# Altium PCB gordak_analog_V1.PcbDoc
Units mm, origin at the board's own origin, x right, y up, seen from the top; angles counter-clockwise.
Board outline 120.25 x 70.25 mm, 2 copper layers (Top Layer, Bottom Layer), stack 1.569 mm thick; 96 components, 52 nets, 228 pads, 8 vias.
Unrouted connection lines stored in the file: 1.
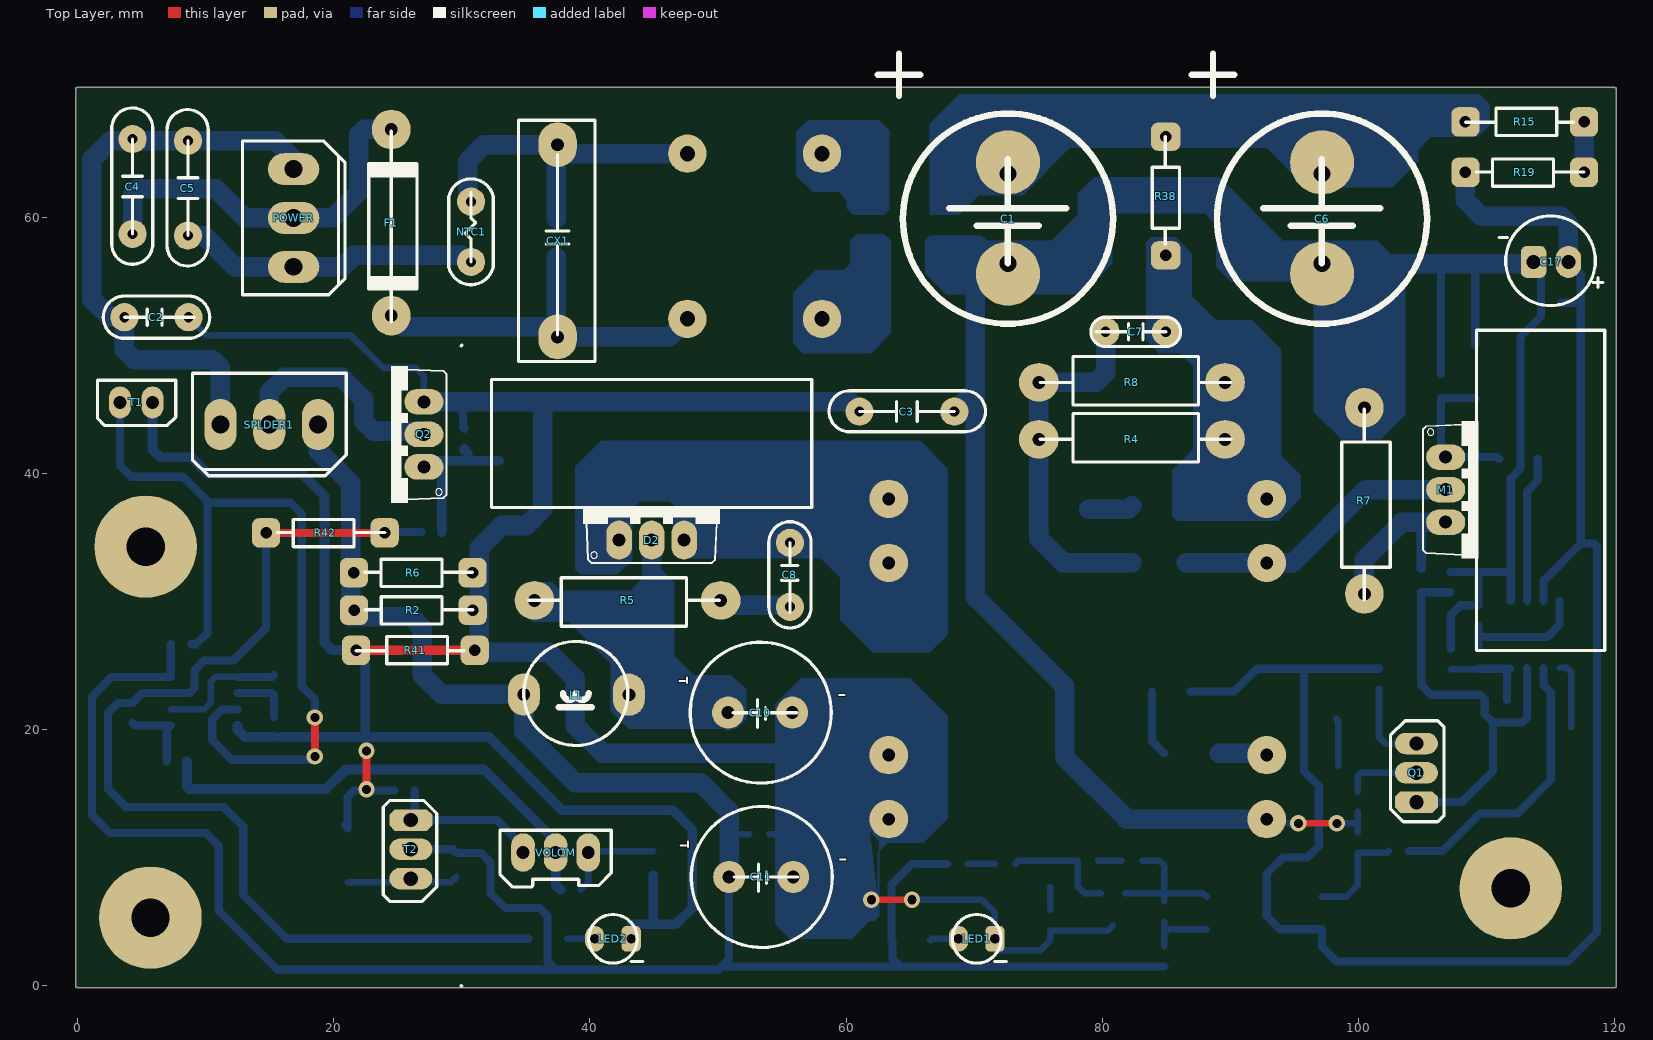
[diagram p0: Top Layer view]
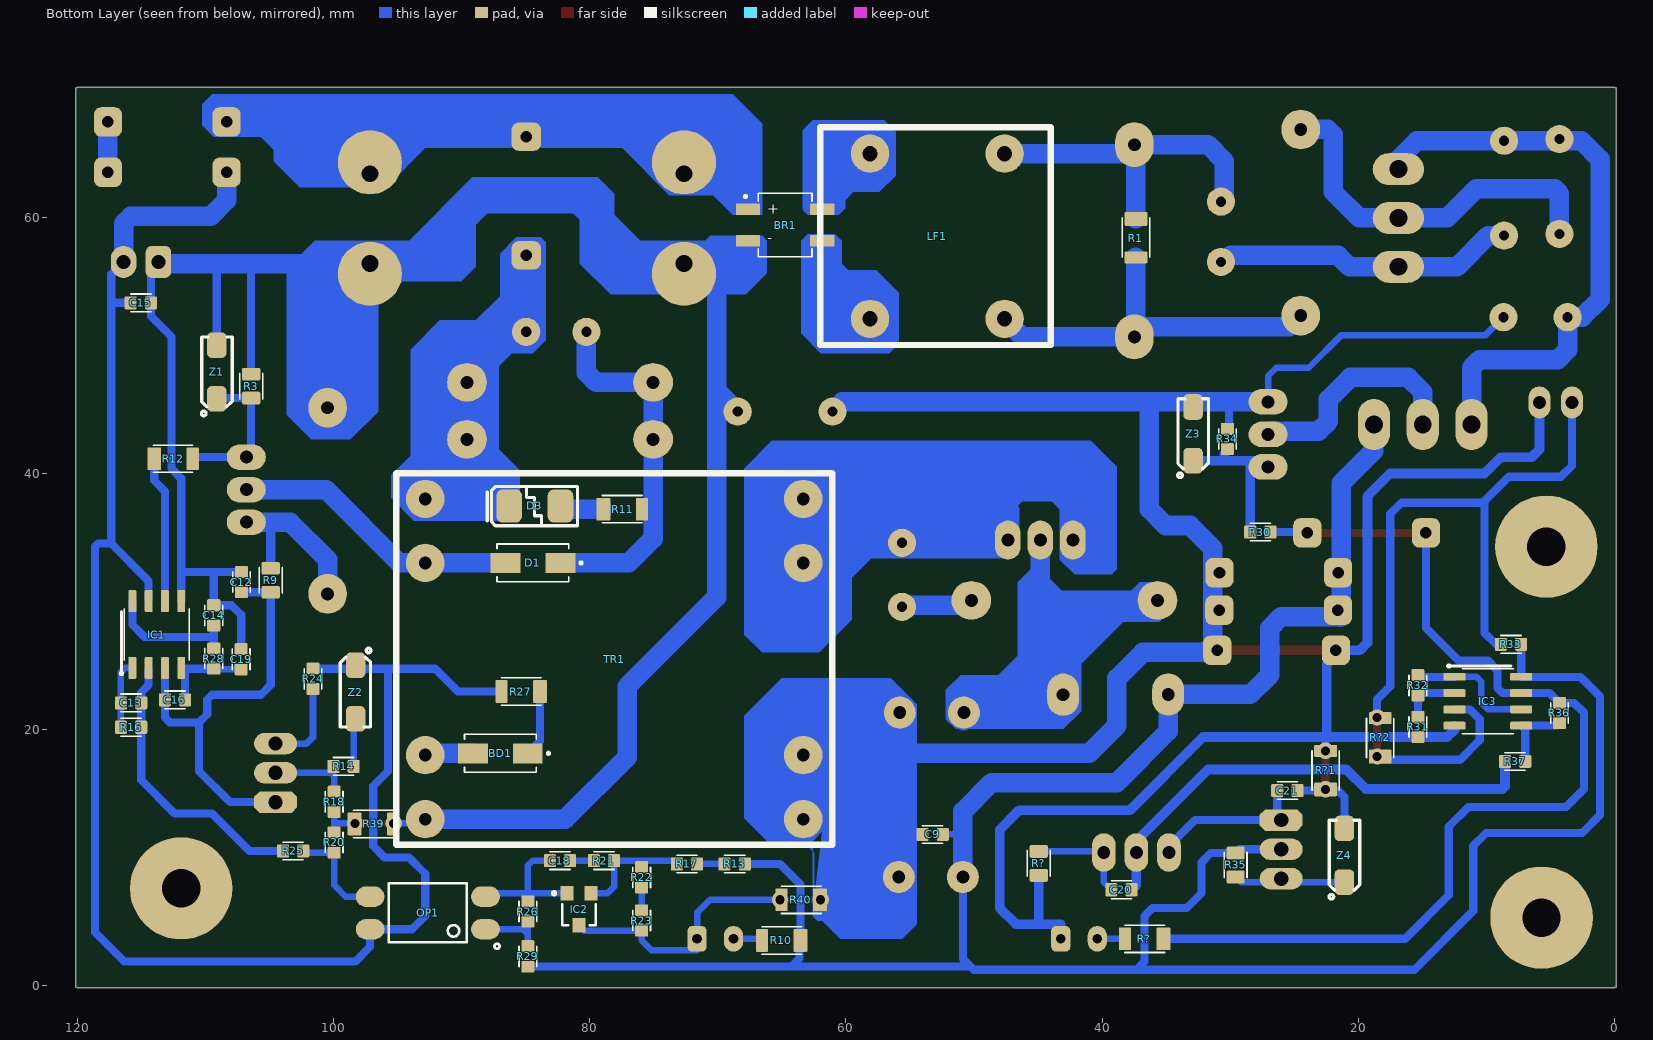
[diagram p1: Bottom Layer view, seen from below]
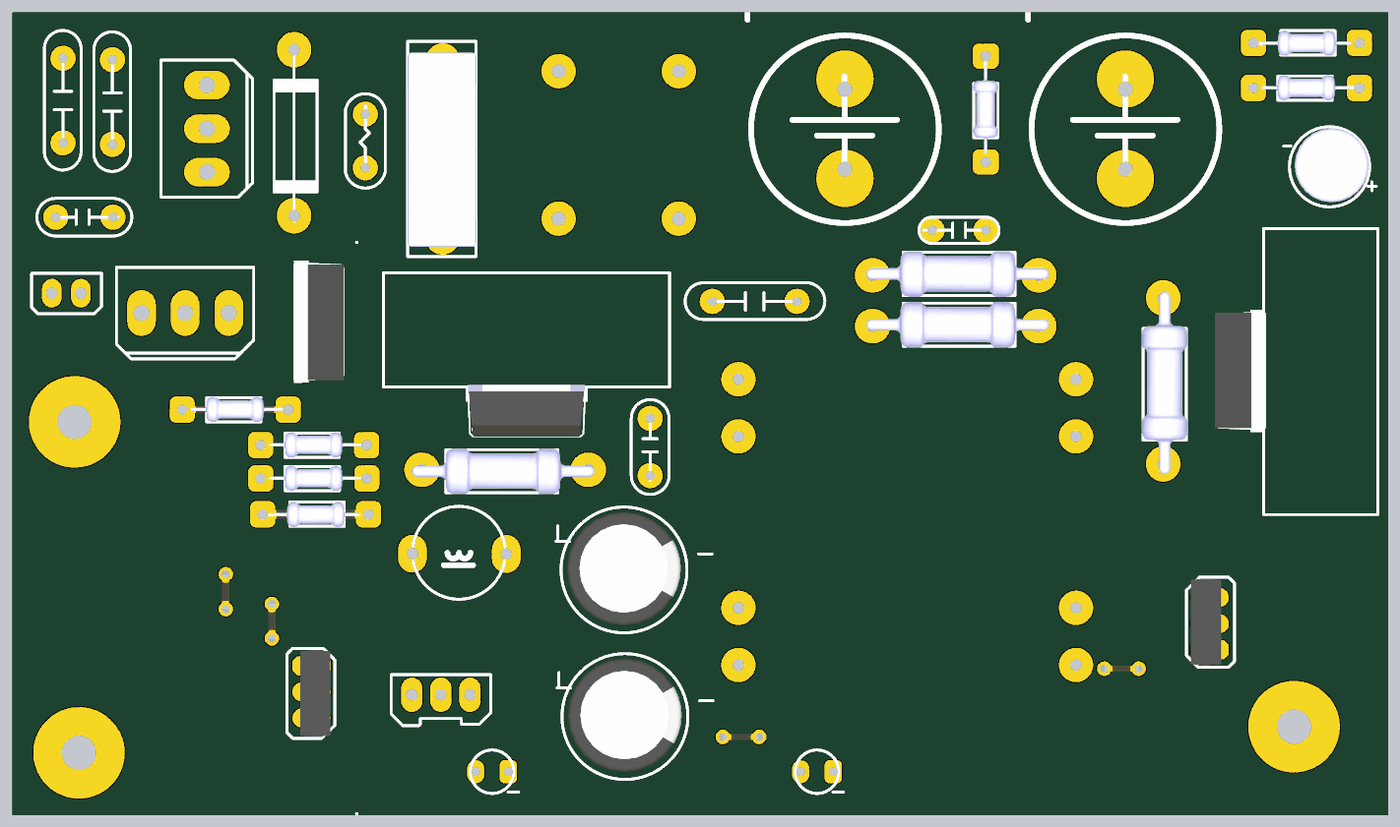
[diagram p2: 3D render of the assembled board from above, using the file's embedded part models]
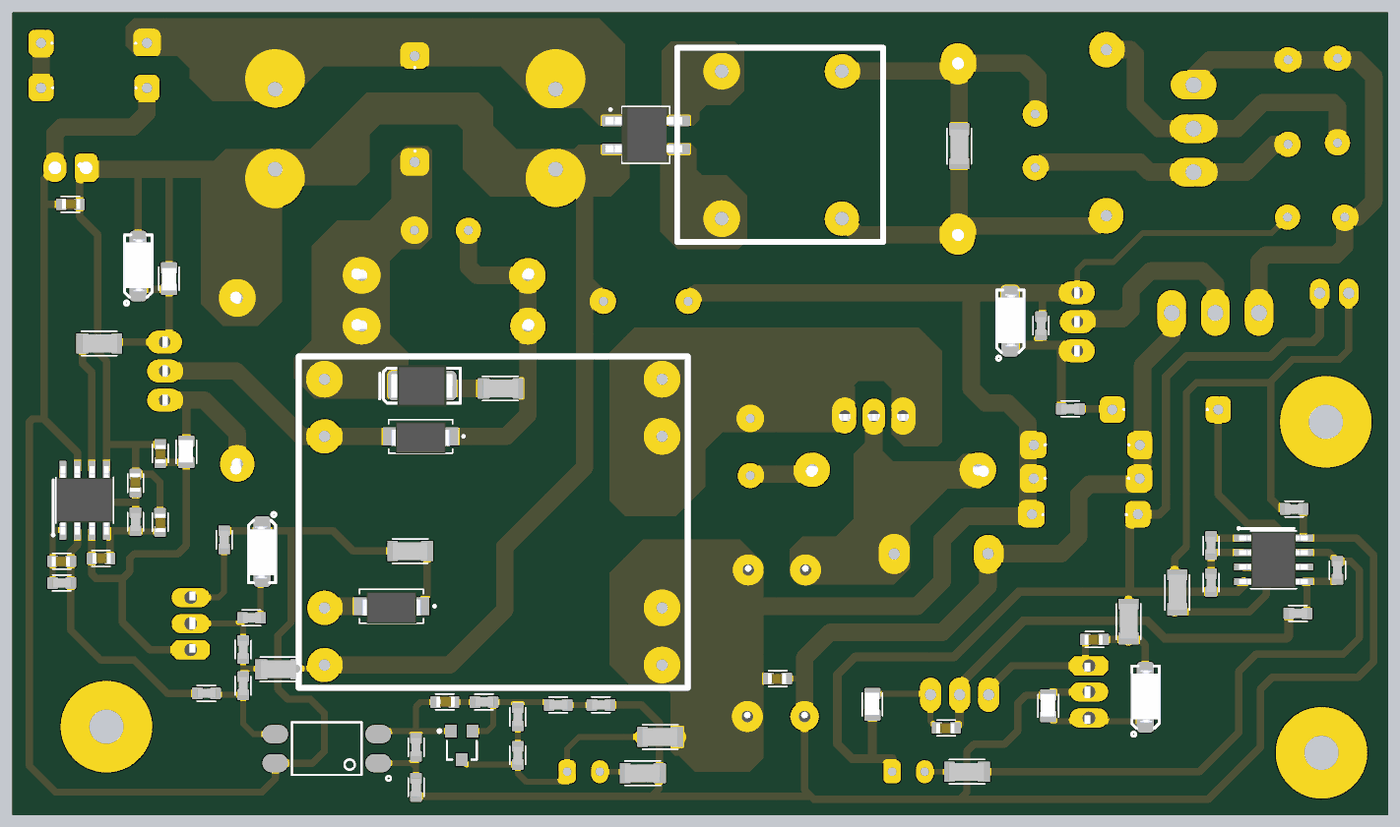
[diagram p3: 3D render of the assembled board from below, using the file's embedded part models]

## Layer stack, top to bottom
Top Solder: solder mask 0.0254, SM-001, Dk 4
Top Layer: signal copper 0.035
Dielectric 1: core 1.4986, Core-043, Dk 4.3
Bottom Layer: signal copper 0.035
Bottom Solder: solder mask 0.0254, SM-001, Dk 4

## Board outline
-0.127,0 -0.127,70 cw(c0,70) 0,70.127 120,70.127 cw(c120,70) 120.127,70 120.127,0 cw(c120,0) 120,-0.127 0.127,-0.127 cw(c0.127,0) 0.064,-0.11 cw(c0,0)

## Design rules (kind name [scope] priority, off if disabled: settings)
Clearance [All] p1: gap=0.254 ignorepadtopadclearanceinfootprint=FALSE except(0: Arc-Hole Track-Hole SMDPad-Hole THPad-Hole Via-Hole Fill-Hole Poly-Hole Region-Hole Text-Hole)
ComponentClearance [All] p1: gap=0 collisioncheckmode=3 verticalgap=0 showdistances=FALSE
PolygonConnect [All] p1: connectstyle=Relief reliefconductorwidth=0.254 reliefentries=4 polygonreliefangle="90 Angle" airgapwidth=0.254
RoutingVias [All] p1: holewidth=0.711 width=1.27 viastyle="Through Hole" minholewidth=0.711 minwidth=1.27 maxholewidth=0.711 maxwidth=1.27
SolderMaskExpansion [All] p1: expansion=0.102 istentingtop=FALSE
Width [All] p1: maxlimit=5 minlimit=0.254 preferedwidth=0.254 minimp=50.000000 maximp=50.000000 favimp=50.000000
29 further rules are at their usual default settings.

## Classes and differential pairs
component class power: BD1 BR1 C1 C2 C3 C4 C5 C6 C7 C8 C9 C10 C11 C12 C13 C14 C15 C16 C17 C18 C19 C20 C21 CX1 D1 D2 D3 F1 IC1 IC2 IC3 L1 LED1 LED2 LF1 M1 NTC1 OP1 POWER Q1 Q2 R1 R2 R3 R4 R5 R6 R7 R8 R9 R10 R11 R12 R13 R14 R15 R16 R17 R18 R19 R20 R21 R22 R23 R24 R25 R26 R27 R28 R29 R30 R31 R32 R33 R34 R35 R36 R37 R? SPLDER1 T1 T2 TR1 VOLOM Z1 Z2 Z3 Z4

## Components (designator, comment, footprint, x,y, rotation, side; value= is the part's Value field where it differs from the comment)
BD1 "US1M" DIOD/1N4007/SMD 84.817,18.161 r0 bottom
BR1 "MB6S" MB6S/SMD 64.749,58.756 r0 bottom
C1 "33uF/400V" CAP-EL-P7MM 72.644,56.388 r90 top
C2 "10nF/2KV" CAP_Y_2KV 3.683,52.197 r0 top
C3 "JY222M" CAP_Y_4KV 61.053,44.831 r0 top
C4 "JY222M" CAP_Y_4KV 4.318,58.699 r90 top
C5 "JY222M" CAP_Y_4KV 8.636,58.572 r90 top
C6 "33uF/400V" CAP-EL-P7MM 97.155,56.388 r90 top
C7 "103,2KV" CAP_Y_1KV 84.963,51.054 r180 top
C8 "10nF/1KV" CAP_Y_2KV 55.626,34.591 r270 top
C9 "100nF" CAP-0603 53.34,11.811 r0 bottom
C10 "1000uF/35V" CAP-EL_P5MM 50.79,21.326 r0 top
C11 "1000uF/35V" CAP-EL_P5MM 50.87,8.499 r0 top
C12 "100pF" CAP-0603 107.171,31.421 r270 bottom
C13 "10nF" CAP-0603 115.899,22.081 r0 bottom
C14 "10nF" CAP-0603 109.364,29.031 r90 bottom
C15 "10nF" CAP-0603 114.935,53.34 r180 bottom
C16 "100pF" CAP-0603 112.268,22.352 r180 bottom
C17 "47uF/50V" cap/330u/16v 113.665,56.515 r0 top
C18 "100nF" CAP-0603 82.221,9.796 r180 bottom
C19 "10nF" CAP-0603 107.188,25.4 r270 bottom
C20 "100nF" CAP-0603 38.608,7.493 r0 bottom
C21 "100nF" CAP-0603 25.654,15.24 r0 bottom
CX1 "0.1uF/275V" CAP/0.22uF/275v/mkt 37.49,65.665 r270 top
D1 "HER208" DIOD/1N4007/SMD 82.277,33.02 r0 bottom
D2 "MBR10100SCT" TO220AB 44.831,34.798 r0 top
D3 "220V" TVS-5V-SMD 82.286,37.465 r0 bottom
F1 "3A" fuze_glass 24.511,66.851 r270 top
IC1 "uc3845" SOP-8 113.665,27.813 r90 bottom
IC2 "TL431" TL431 79.936,7.26 r0 bottom
IC3 "LM358" SOP-8 9.525,22.098 r180 bottom
L1 "10uH" INDUCTOR-10*16 43.053,22.733 r180 top
LED1 "LED-1COLER" led/3MM/DIP 71.628,3.683 r180 top
LED2 "LED-1COLER" led/3MM/DIP 43.236,3.683 r180 top
LF1 "" EMI_MID 47.625,52.07 r0 bottom
M1 "5N60C" TO-220 106.807,38.735 r270 top
NTC1 "5D-9" NTC_XD_7 30.734,56.515 r90 top
OP1 "pc817" pc817 92.837,5.842 r0 bottom
POWER "KF35-3PIN" XH3_BIG 16.891,56.134 r90 top
Q1 "MCR100" TO-225 104.521,16.637 r270 top
Q2 "IRF540" TO-220 27.051,43.053 r90 top
R1 "1M" RES/1206 37.498,58.412 r270 bottom
R2 "2K" RES/0.25W 21.603,29.337 r0 top
R3 "5.6K" RES/0805 105.493,45.769 r90 bottom
R4 "100K" RES/1W 75.057,42.665 r0 top
R5 "100K" RES/1W 50.214,30.099 r180 top
R6 "2K" RES/0.25W 21.59,32.258 r0 top
R7 "0.47R" RES/1W 100.457,45.134 r270 top
R8 "100K" RES/1W 75.057,47.11 r0 top
R9 "820R" RES/0805 105.835,32.717 r270 bottom
R10 "10K" RES/1206 65.024,3.683 r0 bottom
R11 "10R" RES/1206 77.47,37.084 r180 bottom
R12 "15R" RES/1206 112.522,41.021 r180 bottom
R13 "10K" RES/0603 68.778,9.525 r0 bottom
R14 "10R" RES/0603 99.314,17.145 r0 bottom
R15 "100K" RES/0.25W 117.602,67.437 r180 top
R16 "10K" RES/0603 115.895,20.193 r0 bottom
R17 "10K" RES/0603 72.517,9.525 r0 bottom
R18 "1K" RES/0603 99.949,14.478 r90 bottom
R19 "100K" RES/0.25W 108.344,63.5 r0 top
R20 "1K" RES/0603 99.949,11.303 r90 bottom
R21 "1K" RES/0603 78.994,9.779 r0 bottom
R22 "2K" RES/0603 75.946,8.58 r90 bottom
R23 "2K" RES/0603 75.946,5.207 r90 bottom
R24 "5.6K" RES/0603 101.6,23.876 r270 bottom
R25 "5.6K" RES/0603 103.251,10.541 r0 bottom
R26 "10K" RES/0603 84.836,5.715 r270 bottom
R27 "10R" RES/1206 85.344,23.114 r0 bottom
R28 "2K" RES/0603 109.347,25.654 r90 bottom
R29 "1K" RES/0603 84.836,2.413 r90 bottom
R30 "1K" RES/0603 27.559,35.433 r180 bottom
R31 "10K" RES/0603 15.367,20.32 r90 bottom
R32 "10K" RES/0603 15.367,23.368 r270 bottom
R33 "100K" RES/0603 8.001,26.67 r180 bottom
R34 "100K" RES/0603 30.226,42.799 r90 bottom
R35 "10K" RES/0805 30.524,10.492 r270 bottom
R36 "100K" RES/0603 4.318,21.209 r270 bottom
R37 "1K" RES/0603 7.874,17.526 r0 bottom
R38 "2K" RES/0.25W 84.95,57.028 r90 top (schematic designator R6)
R39 "0" RES/1206 96.889,12.516 r180 bottom (schematic designator R12)
R40 "10R" RES/1206 63.5,6.858 r0 bottom (schematic designator R27)
R41 "2K" RES/0.25W 31.018,26.204 r180 top (schematic designator R2)
R42 "2K" RES/0.25W 14.736,35.361 r0 top (schematic designator R6)
R? "10K" RES/1206 36.691,3.814 r0 bottom
R? "10K" RES/0805 45.891,10.619 r270 bottom
R?1 "10K" RES/1206 22.438,16.819 r90 bottom (schematic designator R?)
R?2 "10K" RES/1206 18.183,19.364 r90 bottom (schematic designator R?)
SPLDER1 "KF35-3PIN" XH3_BIG 11.176,43.815 r0 top
T1 "" CONECTOR/XH/2PIN 5.842,45.593 r180 top
T2 "MJE13003" TO-225 26.035,10.668 r90 top
TR1 "TRANSE_50W" TRANSE_50W 92.837,13.02 r180 bottom locked
VOLOM "XH3" XH3 39.854,10.39 r180 top
Z1 "18V" DIOD/RS1J 109.22,48.006 r90 bottom
Z2 "24V" DIOD/RS1J 98.171,22.86 r270 bottom
Z3 "18V" DIOD/RS1J 33.02,43.18 r90 bottom
Z4 "3.3V" DIOD/RS1J 21.209,10.287 r90 bottom

## Footprints (in the part's own frame and the unit in brackets; to place one, negate y for a bottom-side part, rotate by r counter-clockwise, add the part's x,y. Pads: shape width x height; smd on the part's side, far side on the other; paste and mask are expansions set on the pad)
CAP-0603 [mm]
  rrect20% 0.94x1.02 smd: 1(-0.893,-0.017) 2(0.687,-0.017)
  silkscreen extent -0.9,-0.71 0.7,0.67, body extent -0.84,-0.44 0.76,0.46, height 0.77
CAP-EL-P7MM [mm]
  round 5 hole 1.3 copper offset 0.9,0: +(7,0)
  round 5 hole 1.3 copper offset -0.8,0: -(0,0)
  silkscreen extent -4.7,-8.2 16.38,10.16
CAP-EL_P5MM [mm]
  round 2.5 hole 1: +(0.01,0.01) -(5.01,0.01)
  silkscreen extent -2.95,-5.49 8.05,5.51, body extent -2.48,-4.86 7.52,5.14, height 16
CAP/0.22uF/275v/mkt [mm]
  oval 3.5x3 hole 1: 1(0,0) 2(15,0)
  silkscreen extent -1.91,-3.05 16.91,2.92, body extent -0.94,-3.05 16.06,2.95, height 11.5
cap/330u/16v [mm]
  oval 2x2.5 hole 1.1: +(2.72,0)
  rrect50% 2x2.5 hole 1.1: -(0,0)
  silkscreen extent -2.7,-3.41 5.4,3.59, body extent -1.74,-3.02 4.76,3.48, height 11
CAP_Y_1KV [mm]
  round 2.2 hole 0.8: 1(0,0) 2(4.7,0)
  silkscreen extent -1.15,-1.15 5.85,1.15
CAP_Y_2KV [mm]
  round 2.2 hole 0.8: 1(0,0) 2(5,0)
  silkscreen extent -1.65,-1.65 6.65,1.65
CAP_Y_4KV [mm]
  round 2.2 hole 0.8: 1(0,0) 2(7.4,0)
  silkscreen extent -2.37,-1.58 9.83,1.63
CONECTOR/XH/2PIN [mm]
  oval 1.7x2.5 hole 1: 1(-0.033,0.044) 2(2.507,0.044)
  silkscreen extent -1.84,-1.69 4.26,1.84
DIOD/1N4007/SMD [mm]
  rect 2.33x1.56 smd: A(4.299,0) K(0.019,0)
  silkscreen extent -1.7,-1.48 4.96,1.48, body extent -0.44,-1.24 4.76,1.49, height 2.6
DIOD/RS1J [mm]
  rrect50% 2x1.524 smd: A(2.013,-0.106) K(-2.178,-0.106)
  silkscreen extent -3.5,-1.31 2.65,1.09, body extent -2.32,-1.44 2.28,1.16, height 2.1
EMI_MID [mm]
  round 3 hole 1.2: 1(0,0) 2(10.5,0) 3(0,-12.9) 4(10.5,-12.9)
  silkscreen extent -3.61,-14.96 14.39,2.04
fuze_glass [mm]
  oval 3.1x3 hole 1: 1(0,0) 2(14.527,0)
  silkscreen extent 0.11,-1.89 15,2.02
INDUCTOR-10*16 [mm]
  oval 2.5x3.3 hole 1: 1(0,0) 2(8.2,-0.025)
  silkscreen extent 0.08,-4.16 8.2,3.96
led/3MM/DIP [mm]
  oval 1.5x2 hole 0.762: A(2.85,0)
  rrect50% 1.5x2 hole 0.762: K(0,0)
  silkscreen extent -0.89,-1.9 3.32,1.9
MB6S/SMD [mm]
  rrect23% 1.91x0.91 smd: +(2.9,-1.86) -(2.9,0.59) F(-2.9,0.59) N(-2.9,-1.86)
  silkscreen extent -2.1,-3.12 3.2,1.85, body extent -3.19,-3 3.51,1.72, height 2.9
NTC_XD_7 [mm]
  round 2.2 hole 0.8: 1(0,0) 2(4.7,0)
  silkscreen extent -1.78,-1.74 6.48,1.74
pc817 [mm]
  oval 2.25x1.6 smd: 1(-4.699,1.409) 2(-4.699,-1.131) 3(4.301,-1.131) 4(4.301,1.409)
  silkscreen extent -5.8,-2.16 2.85,2.94
RES/0.25W [mm]
  rrect50% 2.2x2.3 hole 0.9: 1(0,0) 2(9.258,0)
  silkscreen extent 0.85,-1.07 9.26,1.05, body extent 0.81,-1.08 8.41,1.12, height 2.1
RES/1W [mm]
  oval 3.1x3 hole 1: 1(0,0) 2(14.527,0)
  silkscreen extent 0.11,-1.76 15,2.02, body extent -0.56,-1.87 15.44,2.13, height 5
RES/0603 [mm]
  rrect20% 0.94x1.02 smd: 1(-0.889,0) 2(0.691,0)
  silkscreen extent -0.9,-0.69 0.7,0.69, body extent -0.93,-0.41 0.67,0.39, height 0.43
RES/0805 [mm]
  rrect25% 1x1.42 smd: 1(0.113,0.933) 2(1.983,0.933)
  silkscreen extent 0.05,0.04 2.05,1.82, body extent 0,0.28 2,1.53, height 0.6
RES/1206 [mm]
  rrect14% 1.09x1.77 smd: 1(-1.469,0.131)
  rrect14% 0.94x1.77 smd: 2(1.536,0.131)
  silkscreen extent -1.55,-0.93 1.55,1.2, body extent -1.51,-0.65 1.59,0.9, height 0.55
SOP-8 [mm]
  rrect25% 1.71x0.61 smd: 1(-2.986,2.032) 2(-2.986,0.762) 3(-2.986,-0.508) 4(-2.986,-1.778) 5(2.224,-1.778) 6(2.224,-0.508) 7(2.224,0.762) 8(2.224,2.032)
  silkscreen extent -3.53,-2.4 1.62,2.98, body extent -3.38,-2.32 2.62,2.58, height 1.75
TL431 [mil]
  rect 40x45 smd: A(35.5,99.24) C(72.91,0.81) REF(-1.9,0.81)
  silkscreen extent -16,-4 117,99
TO220AB [mil]
  oval 78.74x120 hole 40: 1(-100,0) 2(0,0) 3(100,0)
  silkscreen extent -210,-70 210,100, body extent -202,-70 200,107, height 810
TO-220 [mil]
  oval 78.74x120 hole 40: 1(-100.04,-0.04) 2(-0.04,-0.04) 3(99.96,-0.04)
  silkscreen extent -210,-70 210,100, body extent -201,-72 196,103, height 781
TO-225 [mil]
  oval 66x132 hole 44: 1(-90,0) 2(0,0)
  oct 66x132 hole 44: 3(90,0)
  silkscreen extent -160,-80 150,85, body extent -155,-65 144,39, height 520
TRANSE_50W [mm]
  round 3 hole 1: 1(0,25) 2(0,20) 5(0,5) 6(0,0) 7(29.5,0) 8(29.5,5) 11(29.5,20) 12(29.5,25)
  silkscreen extent -2.25,-2.01 31.75,27
TVS-5V-SMD [mm]
  rrect50% 2x2.6 smd: 1(4,0) 2(0,0)
  silkscreen extent -1.33,-1.53 5.72,1.54, body extent -0.66,-1.79 4.74,1.83, height 2.43
XH3 [mm]
  oval 1.85x3 hole 1: 1(-0.024,-0.024) 2(2.516,-0.024) 3(5.056,-0.024)
  silkscreen extent -1.83,-1.78 6.87,2.67
XH3_BIG [mm]
  oval 2.5x4 hole 1.4: 1(0,0) 2(3.81,0) 3(7.62,0)
  silkscreen extent -2.19,-4 9.81,4

## Part data
BD1 D1: library part DIOD/RECTIFIERS
BR1: library part "BRIDGE RECTIFIERS"
C1 C6 C10 C11 C17: library part cap-electrolit
C2 C3 C4 C5 C7 C8: library part CAP_Y
C9 C12 C13 C14 C15 C16 C18 C19 C20 C21: library part cap_smd
CX1: library part cap-mkt
D2: library part DIOD_double
D3: library part TVS-SMD
F1: library part fuze
L1: library part inductor
LF1: library part emi_chok_yd
M1 Q2: library part MOSFET_N_CH
NTC1: library part NTC
R1 R3 R9 R10 R11 R12 R13 R14 R16 R17 R18 R20 R21 R22 R23 R24 R25 R26 R27 R28 R29 R30 R31 R32 R33 R34 R35 R36 R37 R39 R40 R? R? R?1 R?2: library part RES/SMD
R2 R6 R15 R19 R38 R41 R42: library part RES/<1W
R4 R5 R7 R8: library part RES/>=1W
T1: library part CONECTOR/XH/2PIN
T2: library part NPN
Z1 Z2 Z3 Z4: library part zener-0.5w

## Free pads (board coordinates)
  round 8 hole 3: 6(5.334,34.29) 6(5.715,5.334) 6(111.887,7.62)

## Via types
v1: diameter 1.27, hole 0.711, Top Layer to Bottom Layer, 8 vias

## Nets (pads, with @x,y where several pads share a name; then routed paths per layer and width w, separated by ;. In a path a pad name is that pad's centre, name@x,y a point inside that pad or via, vN(x,y) a via of type N, cw(c..) or ccw(c..) an arc to the next point about the centre after c; other vN are vias at no path point)
+3.3: C21.2 T2.3 VOLOM.3 | length 12.5
  Bottom Layer w0.635: C21.2 26.341,13.26 T2.3 32.766,12.954 34.798,10.922 VOLOM.3
+24: C9.1 C11.+ IC3.8 L1.2 R2.1 R6.1 R10.1 R13.1 R29.1 R33.2 R35.1 SPLDER1.3 T2.2 | length 210.3
  Bottom Layer w0.508: 50.88,11.811 50.897,11.828 C9.1
  Bottom Layer w0.635: R33.2 7.301,26.661 IC3.8 2.667,24.13 1.143,22.606 1.143,13.335 2.54,11.938 10.033,11.938 11.049,10.922 11.049,5.842 15.621,1.27 37.338,1.27 ; T2.2 29.302,10.668 R35.1 31.531,10.379 32.258,9.652 32.258,7.239 33.401,6.096 36.068,6.096 36.703,5.461 36.703,1.905 37.338,1.27 ; C11.+ 50.88,2.112 50.292,1.524 ; R13.1 65.151,9.525 63.555,7.929 R10.1 63.627,3.481 63.627,2.159 64.262,1.524 ; R29.1 64.262,1.524 ; 37.338,1.27 50.038,1.27 50.292,1.524 ; 50.292,1.524 64.262,1.524
  Bottom Layer w1.524: SPLDER1.3 18.796,41.783 21.349,39.23 21.349,32.258 21.349,28.829 R2.1@21.413,28.765 ; R2.1@21.476,28.829 26.035,28.829 26.924,27.94 26.924,24.282 28.448,22.758 L1.2 34.853,19.884 38.862,15.875 48.641,15.875 50.88,13.636 50.88,11.811 C11.+
+310: BR1.+ C1.+ C6.+ C7.1 D3.1 R4.2 R8.2 R15.2 R38.1 R38.2 TR1.1 | length 39.3
  Bottom Layer w1.524: R38.1@84.836,56.769 84.836,51.181 C7.1 90.932,51.054 92.837,49.149 92.837,48.133 ; D3.1 92.282,37.465 TR1.1 92.837,42.672 ; R4.2 92.83,42.665 92.837,42.672 ; R8.2 90.607,48.133 92.837,48.133 ; 92.837,42.672 92.837,48.133
E: C2.1 C4.2 C5.2 POWER.3 SPLDER1.1 | length 46.8
  Bottom Layer w1.524: SPLDER1.1 11.176,48.26 10.541,48.895 4.445,48.895 3.683,49.657 C2.1 2.54,52.197 1.143,53.594 1.143,64.516 2.599,65.972 C5.2 15.435,65.972 16.891,64.516 POWER.3
GND: BR1.- C1.- C3.2 C6.- C12.1 C14.2 C15.2 C17.- C19.1 IC1.5 R3.2 R7.1 R18.1 R20.2 R39.1 R39.2 TR1.6 Z1.A | length 187.8
  Top Layer w0.508: v1(95.305,12.696) v1(98.31,12.696)
  Bottom Layer w0.508: TR1.6 93.161,12.696 v1(95.305,12.696) ; v1(98.31,12.696) 99.854,12.696 99.949,12.792 ; R20.2 99.949,12.792 ; R18.1 99.949,12.792
  Bottom Layer w0.635: R3.2 106.426,56.261 106.553,56.388 ; C12.1 109.509,32.314 ; C19.1 107.205,28.973 107.95,29.718 C14.2 109.347,32.152 109.509,32.314 ; 109.093,56.388 109.114,56.367 Z1.A ; IC1.5 111.887,32.258 ; C17.- 114.248,55.932 C15.2 114.248,52.272 112.649,50.673 112.649,40.386 111.887,39.624 111.887,32.258 ; 109.509,32.314 111.831,32.314 111.887,32.258
  Bottom Layer w1.524: C3.2 70.104,46.482 ; TR1.6 81.915,13.02 77.089,17.846 77.089,23.368 70.104,30.353 70.104,41.402 70.104,46.482 ; R7.1 100.457,54.61 C6.-@98.679,56.388 ; C17.- 113.538,56.388 109.093,56.388 106.553,56.388 C6.-@98.679,56.388 ; 70.104,46.482 70.104,55.16 71.416,55.16 C1.- 77.089,56.388 79.502,58.801 79.502,60.579 80.772,61.849 87.757,61.849 89.789,59.817 89.789,57.023 90.424,56.388 C6.- C6.-@98.679,56.388
GND_S: C2.2 C3.1 C9.2 C10.- C11.- C21.1 IC2.A IC3.4 LED1.K LED2.K Q2.3 R2.2 R6.2 R23.1 R31.1 R34.2 R40.1 R40.2 R41.1 R41.2 R?1.1 R?1.2 R?.2@44.958,8.636 T1.1 TR1.7 TR1.8 Z3.A Z4.A | length 283.2
  Top Layer w0.508: v1(61.98,6.727) v1(65.155,6.727)
  Top Layer w0.635: v1(22.569,15.347) v1(22.569,18.356)
  Top Layer w0.762: R41.2 R41.1
  Bottom Layer w0.508: C2.2 10.08,50.8 21.336,50.8 23.876,48.26 26.416,48.26 27.052,47.624 Q2.3 ; Z4.A@20.824,12.579 Z4.A ; R41.1@31.369,26.035 R41.1@31.369,26.67 ; C9.2 55.783,11.828 55.8,11.811 ; 55.8,17.098 55.8,17.018 55.8,11.811 ; R40.1@61.722,6.985 v1(61.98,6.727) 57.662,6.727 C11.- 55.8,8.589 55.8,11.811 ; TR1.7 TR1.8 ; R40.2 v1(65.155,6.727) 66.417,6.727 66.421,6.731 70.612,6.731 71.628,5.715 71.628,2.794 75.184,2.794 75.946,3.556 R23.1 80.417,4.318 IC2.A
  Bottom Layer w0.635: Z4.A 21.103,14.753 21.607,15.257 C21.1 ; 22.479,19.431 22.569,19.341 v1(22.569,18.356) ; v1(22.569,15.347) R?1.1 ; 30.099,45.592 30.099,43.617 R34.2
  Bottom Layer w0.762: T1.1 5.875,41.877 6.477,41.275 8.89,41.275 10.16,40.005 17.526,40.005 19.304,38.227 19.304,26.797 19.897,26.204 R41.2@21.421,26.204 ; IC3.4 12.511,20.001 13.081,19.431 R31.1 ; R31.1@15.875,19.431 22.479,19.431 ; R41.2 R41.2@21.421,26.204 ; 43.236,4.826 45.212,4.826 ; R?.2@44.958,8.636 44.958,5.08 45.212,4.826 ; R41.2@21.421,26.204 22.479,25.146 22.479,19.431 ; 22.479,19.431 32.131,19.431 37.846,13.716 46.482,13.716 48.006,12.192 48.006,6.096 46.736,4.826 45.212,4.826
  Bottom Layer w1.524: Q2.3 30.099,45.592 36.322,45.592 ; 55.8,17.018 62.335,17.018 TR1.8 ; 55.8,17.098 55.8,18.161 ; C10.-@55.8,20.701 55.8,18.161 ; C3.1 60.292,45.592 36.322,45.592 ; 36.322,45.592 36.322,37.211 35.052,35.941 33.147,35.941 31.369,34.163 31.369,26.67 32.004,26.035 36.83,26.035 38.862,24.003 38.862,20.32 41.021,18.161 55.8,18.161
NetBD1_A: BD1.A TR1.5 | length 3.8
  Bottom Layer w0.508: TR1.5@92.696,18.161 TR1.5
  Bottom Layer w1.524: BD1.A TR1.5@92.696,18.161
NetBD1_K: BD1.K R27.1 | length 5.2
  Bottom Layer w0.635: R27.1 83.875,19.122 BD1.K
NetBR1_F: BR1.F LF1.2
NetBR1_N: BR1.N LF1.4
NetC4_1: C4.1 F1.1 POWER.2 | length 30.1
  Bottom Layer w1.524: C4.1 4.318,61.849 4.699,62.23 10.795,62.23 13.081,59.944 POWER.2 19.939,59.944 21.971,61.976 21.971,66.421 22.401,66.851 F1.1 F1.1@24.511,67.056
NetC5_1: C5.1 NTC1.1 POWER.1 | length 23.4
  Bottom Layer w1.524: C5.1 9.881,58.572 12.319,56.134 POWER.1 20.701,56.134 21.59,57.023 29.972,57.023 NTC1.1@30.48,56.515
NetC7_2: C7.2 D1.K R4.1 R8.1 R11.2 | length 28.9
  Bottom Layer w1.524: C7.2 80.263,47.878 79.495,47.11 R8.1 R4.1 75.057,34.925 76.962,33.02 D1.K
NetC8_1: C8.1 D2.1 D2.3 TR1.11 TR1.12 | length 40.2
  Bottom Layer w1.524: D2.1 42.291,38.227 43.307,39.243 47.498,39.243 ; D2.3 47.371,39.116 47.498,39.243 ; C8.1@55.245,34.163 55.245,38.804 54.806,39.243 ; TR1.11 TR1.12 62.114,39.243 54.806,39.243 ; 47.498,39.243 54.806,39.243
NetC8_2: C8.2 R5.1 | length 5.5
  Bottom Layer w1.524: R5.1@50.165,29.718 55.499,29.718 C8.2
NetC10_+: C10.+ D2.2 L1.1 R5.2 | length 31.7
  Bottom Layer w1.524: R5.2@35.638,29.718 43.688,29.718 44.831,30.861 ; D2.2 44.831,30.861 ; C10.+@50.8,20.701 49.682,21.819 42.998,21.819 44.831,23.652 44.831,30.861
NetC12_2: C12.2 C16.1 IC1.3 Q1.3 R9.2 | length 34.5
  Bottom Layer w0.635: Q1.3 108.077,14.351 110.49,16.764 110.49,20.574 ; C12.2 R9.2 104.902,23.495 105.664,22.733 109.474,22.733 109.855,22.352 109.855,21.209 110.49,20.574 ; IC1.3 113.157,22.339 C16.1 113.161,20.959 112.776,20.574 110.49,20.574
NetC13_1: C13.1 IC1.2 R16.1 R25.2 | length 22.3
  Bottom Layer w0.635: R25.2 106.553,10.541 109.474,13.462 112.395,13.462 115.006,16.073 R16.1 C13.1 115.006,22.916 114.427,23.495 IC1.2
NetC13_2: C13.2 IC1.1 R16.2 | length 5.3
  Bottom Layer w0.508: IC1.1 116.27,24.827 116.586,24.511 C13.2 R16.2
NetC14_1: C14.1 IC1.8 R28.2 | length 10.4
  Bottom Layer w0.635: R28.2 109.347,27.241 ; C14.1 109.347,27.241 ; IC1.8 115.697,28.194 114.745,27.241 109.347,27.241
NetC16_2: C16.2 C19.2 IC1.4 R28.1 | length 7.2
  Bottom Layer w0.508: C19.2 109.295,24.713 R28.1
  Bottom Layer w0.635: R28.1 111.825,24.765 111.581,24.521 C16.2
NetC18_1: C18.1 IC2.C OP1.2 R26.1 | length 11.1
  Bottom Layer w0.508: IC2.C 84.836,7.239 ; C18.1 84.455,9.779 84.836,9.398 84.836,7.239 ; R26.1 84.836,7.239 ; OP1.2 87.871,7.239 84.836,7.239
NetC18_2: C18.2 R21.2 | length 1.8
  Bottom Layer w0.508: R21.2 C18.2
NetC20_1: C20.1 R37.2 VOLOM.2 | length 37.7
  Bottom Layer w0.762: R37.2 8.565,15.565 8.763,15.367 19.431,15.367 20.955,16.891 31.75,16.891 37.338,11.303 VOLOM.2 37.338,7.887 C20.1
NetC20_2: C20.2 R?.1@44.958,10.506 VOLOM.1 | length 8.3
  Bottom Layer w0.508: C20.2 39.878,8.093 VOLOM.1 39.97,10.506 R?.1@44.958,10.506
NetCX1_1: CX1.1 LF1.3 NTC1.2 R1.1 | length 27
  Bottom Layer w1.524: NTC1.2@30.48,61.215 30.48,64.389 31.756,65.665 CX1.1 ; R1.1 37.367,65.541 CX1.1 ; LF1.3 38.185,64.97 CX1.1
NetCX1_2: CX1.2 F1.2 LF1.1 R1.2 | length 29.6
  Bottom Layer w1.524: F1.2 25.4,51.435 CX1.2@36.72,51.435 ; R1.2 37.367,50.788 CX1.2 46.22,50.665 LF1.1
NetD1_A: D1.A M1.2 TR1.2 | length 22.6
  Bottom Layer w1.524: D1.A TR1.2 94.869,33.02 100.585,38.736 M1.2
NetD3_2: D3.2 R11.1 | length 3.5
  Bottom Layer w1.524: R11.1 82.036,37.215 D3.2
NetIC1_6: IC1.6 R12.1 | length 11.5
  Bottom Layer w0.635: IC1.6 113.157,38.608 113.991,39.442 R12.1
NetIC2_REF: IC2.REF R17.2 R21.1 R22.2 | length 9
  Bottom Layer w0.508: R17.2 73.462,9.779 R21.1 78.105,7.747 78.613,7.239 IC2.REF
NetIC3_1: IC3.1 IC3.6 R32.1 | length 10.1
  Bottom Layer w0.508: IC3.6 9.906,21.59 10.414,22.098 10.414,23.749 10.795,24.13 IC3.1
  Bottom Layer w0.635: IC3.1 15.24,24.13 R32.1
NetIC3_2: IC3.2 R31.2 R32.2 | length 4.6
  Bottom Layer w0.635: IC3.2 15.184,22.86 R32.2 R31.2
NetIC3_3: IC3.3 R33.1 R?2.1 R?2.2 T1.2 | length 64.6
  Top Layer w0.635: v1(18.542,17.907) v1(18.542,20.955)
  Bottom Layer w0.635: T1.2 3.335,40.607 4.191,39.751 8.255,39.751 10.16,37.846 10.16,37.719 ; R33.1 9.271,26.67 10.16,27.559 10.16,37.719 ; IC3.3 11.303,21.59 10.541,20.828 10.541,19.177 12.065,17.653 18.288,17.653 v1(18.542,17.907) ; v1(18.542,20.955) 18.542,22.352 17.526,23.368 17.526,36.83 16.637,37.719 10.16,37.719
NetIC3_5: IC3.5 R36.2 R37.1 | length 6
  Bottom Layer w0.635: R36.2 4.516,20.32 IC3.5 6.985,20.004 R37.1
NetIC3_7: IC3.7 R30.2 R36.1 R42.1 R42.2 R?.1@35.222,3.683 | length 82.2
  Top Layer w0.635: R42.1 R42.2
  Bottom Layer w0.635: R42.1 14.736,27.944 12.192,25.4 9.906,25.4 9.144,24.638 9.144,23.241 8.763,22.86 IC3.7 5.08,22.86 R36.1 3.175,22.098 2.413,21.336 2.413,15.367 3.81,13.97 11.43,13.97 12.954,12.446 12.954,7.112 16.383,3.683 R?.1@35.222,3.683 ; R42.2 24.065,35.433 R30.2
NetLED1_A: LED1.A R10.2 | length 2.3
  Bottom Layer w0.508: R10.2 66.691,3.683 LED1.A
NetLED2_A: LED2.A R?.2@38.227,3.683 | length 2.2
  Bottom Layer w0.508: R?.2@38.227,3.683 LED2.A
NetM1_1: M1.1 R3.1 R12.2 Z1.K | length 11.7
  Bottom Layer w0.635: Z1.K 109.06,45.882 R3.1 106.426,41.656 M1.1 110.861,41.276 R12.2
NetM1_3: M1.3 R7.2 R9.1 | length 13.9
  Bottom Layer w0.762: 104.775,36.196 104.902,36.069 R9.1
  Bottom Layer w1.524: R7.2 100.457,33.274 103.379,36.196 104.775,36.196 M1.3
NetOP1_1: OP1.1 R26.2 R29.2 | length 5.4
  Bottom Layer w0.508: R29.2 84.836,4.064 ; R26.2 84.836,4.064 ; OP1.1 85.205,4.433 84.836,4.064
NetOP1_3: OP1.3 R20.1 R25.1 | length 8.2
  Bottom Layer w0.508: OP1.3 99.048,6.973 99.949,7.874 R20.1 102.235,10.414 R25.1
NetQ1_1: Q1.1 R24.2 | length 6.9
  Bottom Layer w0.508: R24.2 101.6,19.431 102.108,18.923 Q1.1
NetQ1_2: Q1.2 R14.2 R18.2 | length 5.9
  Bottom Layer w0.508: R18.2 99.949,16.383 100.203,16.637 Q1.2
NetQ2_1: Q2.1 R30.1 R34.1 Z3.K | length 13.6
  Bottom Layer w0.762: R30.1 28.448,40.512 Q2.1 27.542,41.002 30.48,41.002 ; R34.1 30.226,41.783 30.48,41.529 30.48,41.002 ; Z3.K 30.48,41.002
NetQ2_2: Q2.2 SPLDER1.2 | length 17.9
  Bottom Layer w1.524: SPLDER1.2 14.986,46.355 16.129,47.498 20.637,47.498 22.352,45.783 22.352,44.069 23.113,43.308 26.796,43.308 Q2.2
NetR13_2: R13.2 R17.1 | length 2.2
  Bottom Layer w0.508: R13.2 R17.1
NetR14_1: R14.1 Z2.A | length 3.8
  Bottom Layer w0.508: Z2.A 98.425,20.699 R14.1
NetR15_1: R15.1 R19.2 | length 3.9
  Bottom Layer w1.524: R19.2 R15.1
NetR22_1: R22.1 R23.2 | length 1.8
  Bottom Layer w0.508: R23.2 R22.1
NetR35_2: R35.2 T2.1 Z4.K | length 8.7
  Bottom Layer w0.508: Z4.K 29.191,8.109 R35.2
VCC: C15.1 C17.+ IC1.7 OP1.4 R19.1 R24.1 R27.2 Z2.K | length 142.1
  Bottom Layer w0.635: R27.2 90.293,22.983 92.075,24.765 95.758,24.765 ; R24.1 95.758,24.765 ; IC1.7 114.427,31.623 117.348,34.544 ; C15.1 117.204,53.323 117.348,53.467 ; C17.+ 117.348,55.552 117.348,53.467 ; 95.758,24.765 95.758,16.764 96.901,15.621 96.901,10.922 96.012,10.033 94.107,10.033 92.837,8.763 92.837,5.461 93.865,4.433 OP1.4 97.138,3.065 98.298,1.905 116.332,1.905 118.618,4.191 118.618,34.29 118.364,34.544 117.348,34.544 ; 117.348,34.544 117.348,53.467
  Bottom Layer w1.524: R19.1 108.344,61.328 109.601,60.071 115.824,60.071 116.385,59.51 C17.+

## Other copper
Bottom Layer:
  region net GND_S: 62.484,6.731 62.484,10.414 63.246,11.176 66.04,11.176 67.945,13.081 67.945,21.082 65.024,24.003 56.515,24.003 54.483,21.971 54.483,4.826 55.626,3.683 60.452,3.683 61.849,5.08 62.23,5.08 62.611,5.461 62.611,11.303 61.849,12.065
  region net NetC10_+: 35.56,31.496 37.084,31.496 37.719,30.861 43.18,30.861 44.323,32.004 44.323,34.417 44.45,34.417 44.831,34.798 45.466,34.163 45.466,32.639 46.609,31.496 46.609,25.781 48.133,24.257 51.054,24.257 52.197,23.114 52.197,20.828 51.435,20.066 43.053,20.066 41.656,21.463 41.656,25.146 38.354,28.448 35.56,28.448 35.179,28.829 35.179,29.845
  region net NetC8_1: 39.243,32.131 42.164,32.131 43.307,33.274 43.307,37.211 43.942,37.846 46.228,37.846 46.609,37.465 46.482,37.338 46.482,34.29 47.371,33.401 58.039,33.401 59.563,31.877 59.563,28.575 62.103,26.035 66.548,26.035 67.945,27.432 67.945,40.386 65.786,42.545 40.894,42.545 38.862,40.513 38.862,32.512
  region net +310: 83.439,50.419 84.455,49.403 86.106,49.403 87.122,48.387 87.122,41.91 85.471,40.259 85.471,36.703 85.852,36.322 93.726,36.322 95.504,38.1 95.504,39.878 93.98,41.402 93.98,49.657 91.694,51.943 88.9,51.943 86.995,53.848 86.995,57.15 85.725,58.42 83.82,58.42 83.439,58.039
  region net GND: 88.773,60.579 88.9,60.452 88.9,56.134 90.043,54.991 95.758,54.991 96.774,53.975 96.774,56.261 94.488,56.261 90.551,60.198 90.551,60.325
  region net GND: 70.612,58.547 70.993,58.166 76.073,58.166 78.105,60.198 78.105,61.849 79.375,63.119 89.154,63.119 94.107,58.166 101.473,58.166 103.632,56.007 103.632,44.577 101.727,42.672 98.679,42.672 96.52,44.831 96.52,53.086 93.98,55.626 92.71,55.626 88.011,60.325 81.28,60.325 80.772,59.817 80.772,56.388 78.359,53.975 67.818,53.975 66.167,55.626 66.167,58.166 66.548,58.547
  region net +310: 68.834,60.198 70.358,61.722 73.787,61.722 77.47,65.405 92.837,65.405 95.885,62.357 102.616,62.357 104.648,64.389 104.648,65.278 105.664,66.294 109.347,66.294 110.236,67.183 110.236,68.834 109.474,69.596 68.834,69.596 66.548,67.31 66.548,60.198
  region net NetBR1_F: 62.992,58.674 63.5,58.166 63.5,50.927 61.976,49.403 56.642,49.403 55.88,50.165 55.88,54.102 57.658,55.88 59.817,55.88 60.325,56.388 60.325,58.166 60.833,58.674 61.595,58.674
  region net NetBR1_N: 62.992,60.198 63.373,60.579 63.373,66.802 62.611,67.564 57.023,67.564 56.134,66.675 56.134,63.246 57.404,61.976 59.436,61.976 60.071,61.341 60.071,60.706 60.579,60.198
  region: 60.96,60.325

## Silkscreen, mask and mechanical layers (free items; w line width, h text height)
Top Overlay:
  lines w0.254: 29.972,0.028 30,0 ; 29.972,49.972 30,50 ; 32.326,37.338 57.326,37.338 57.326,47.338 32.326,47.338 32.326,37.338 ; 109.219,26.182 109.219,51.182 119.219,51.182 119.219,26.182 109.219,26.182
Mechanical 1:
  lines w0.254: 0,0 0,70 120,70 120,0 0.127,0 0,0.127

## Text inside footprints (layer, text, board x,y; h text height)
BR1: Bottom Overlay "-" at 66.149,57.991 h0.81; Bottom Overlay "+" at 66.148,60.281 h0.81
C10: Top Overlay "-" at 48.153,23.49 h1.52 r90; Top Overlay "-" at 46.884,23.238 h1.52; Top Overlay "-" at 59.33,22.131 h1.52
C11: Top Overlay "-" at 48.233,10.663 h1.52 r90; Top Overlay "-" at 46.964,10.411 h1.52; Top Overlay "-" at 59.41,9.304 h1.52